# Altium PCB Thunderscope_Rev5.3.PcbDoc (part 4 of 14)
Units mil, origin at the board's own origin, x right, y up, seen from the top; angles counter-clockwise.
Board outline 3937.01 x 3838.58 mil, 6 copper layers (F.Cu, In1.Cu (GND), In2.Cu (Sign), In3.Cu (Sign), In4.Cu (GND), B.Cu), stack 60.556 mil thick; 911 components, 486 nets, 2834 pads, 2761 vias.
Unrouted connection lines stored in the file: 618.
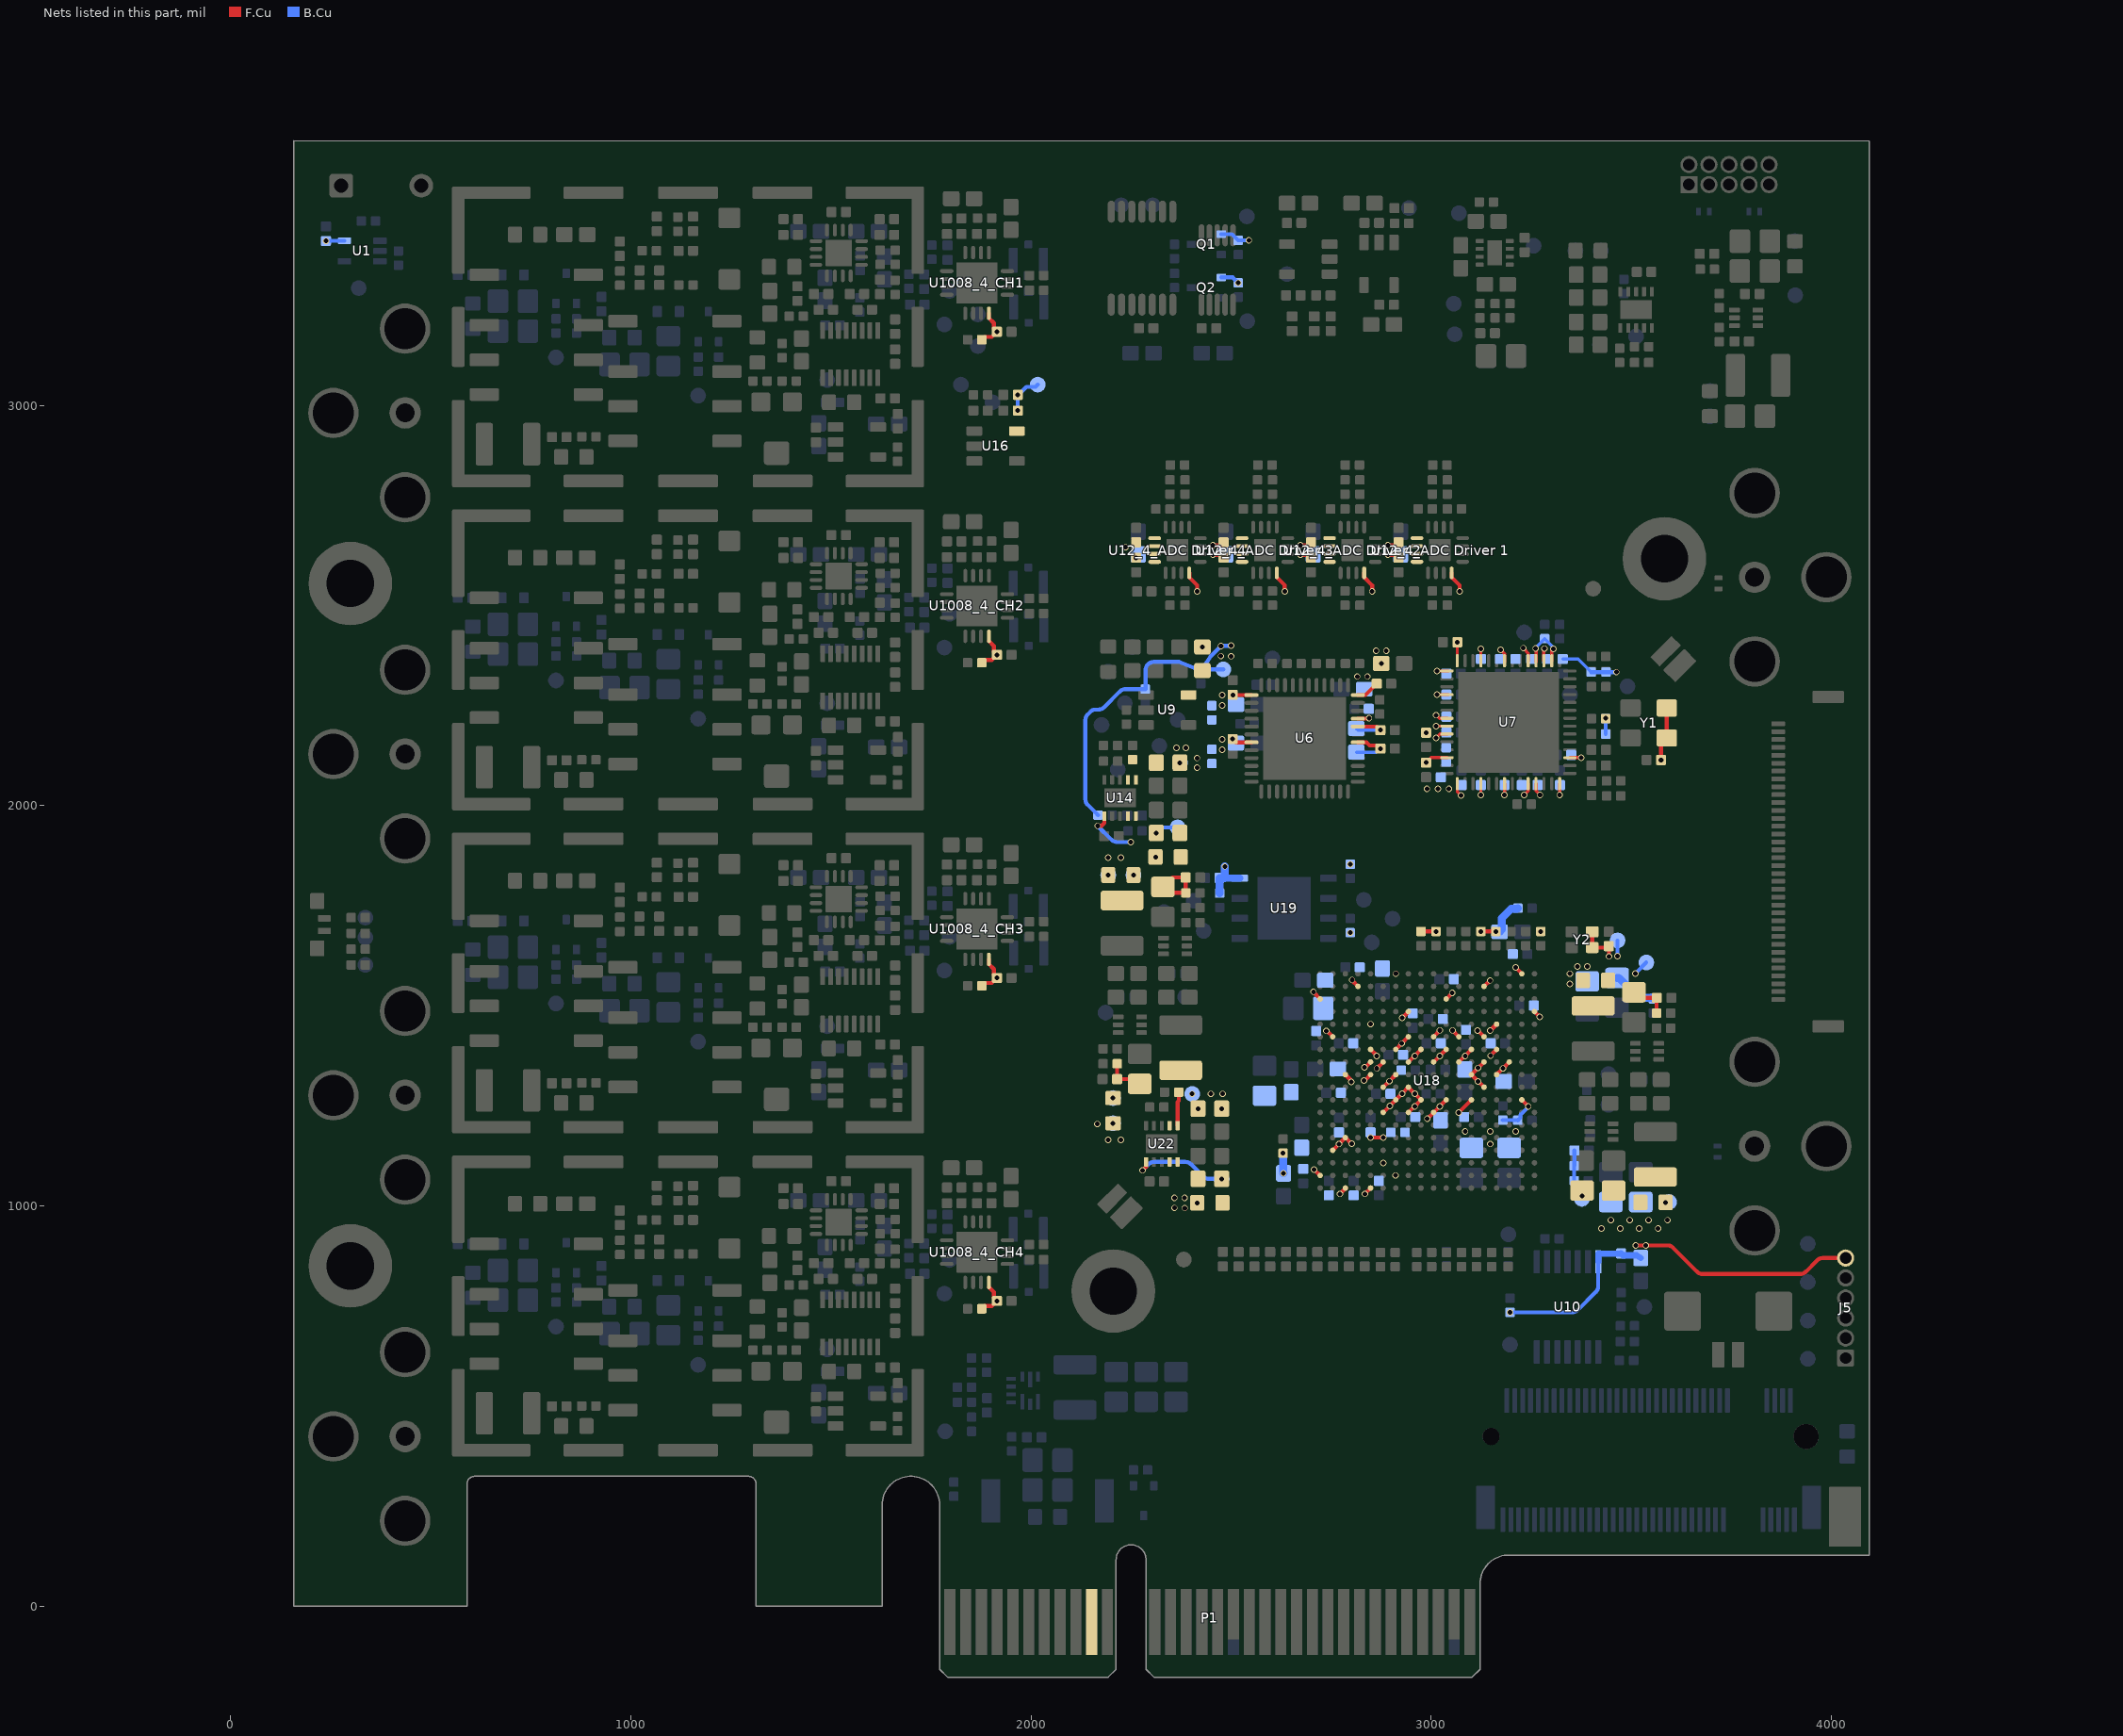
[diagram p8: the nets of this part, all layers, seen from the top]

## Footprints (in the part's own frame and the unit in brackets; to place one, negate y for a bottom-side part, rotate by r counter-clockwise, add the part's x,y. Pads: shape width x height; smd on the part's side, far side on the other; paste and mask are expansions set on the pad) (continued)
XILINX_XC7A50T-2CSG325C [mm]
  round 0.35 smd mask+0: A1(-6.8,6.8) A2(-6,6.8) A3(-5.2,6.8) A4(-4.4,6.8) A5(-3.6,6.8) A6(-2.8,6.8) A7(-2,6.8) A8(-1.2,6.8) A9(-0.4,6.8) A10(0.4,6.8) A11(1.2,6.8) A12(2,6.8) A13(2.8,6.8) A14(3.6,6.8) A15(4.4,6.8) A16(5.2,6.8) A17(6,6.8) A18(6.8,6.8) B1(-6.8,6) B2(-6,6) B3(-5.2,6) B4(-4.4,6) B5(-3.6,6) B6(-2.8,6) B7(-2,6) B8(-1.2,6) B9(-0.4,6) B10(0.4,6) B11(1.2,6) B12(2,6) B13(2.8,6) B14(3.6,6) B15(4.4,6) B16(5.2,6) B17(6,6) B18(6.8,6) C1(-6.8,5.2) C2(-6,5.2) C3(-5.2,5.2) C4(-4.4,5.2) C5(-3.6,5.2) C6(-2.8,5.2) C7(-2,5.2) C8(-1.2,5.2) C9(-0.4,5.2) C10(0.4,5.2) C11(1.2,5.2) C12(2,5.2) C13(2.8,5.2) C14(3.6,5.2) C15(4.4,5.2) C16(5.2,5.2) C17(6,5.2) C18(6.8,5.2) D1(-6.8,4.4) D2(-6,4.4) D3(-5.2,4.4) D4(-4.4,4.4) D5(-3.6,4.4) D6(-2.8,4.4) D7(-2,4.4) D8(-1.2,4.4) D9(-0.4,4.4) D10(0.4,4.4) D11(1.2,4.4) D12(2,4.4) D13(2.8,4.4) D14(3.6,4.4) D15(4.4,4.4) D16(5.2,4.4) D17(6,4.4) D18(6.8,4.4) E1(-6.8,3.6) E2(-6,3.6) E3(-5.2,3.6) E4(-4.4,3.6) E5(-3.6,3.6) E6(-2.8,3.6) E7(-2,3.6) E8(-1.2,3.6) E9(-0.4,3.6) E10(0.4,3.6) E11(1.2,3.6) E12(2,3.6) E13(2.8,3.6) E14(3.6,3.6) E15(4.4,3.6) E16(5.2,3.6) E17(6,3.6) E18(6.8,3.6) F1(-6.8,2.8) F2(-6,2.8) F3(-5.2,2.8) F4(-4.4,2.8) F5(-3.6,2.8) F6(-2.8,2.8) F7(-2,2.8) F8(-1.2,2.8) F9(-0.4,2.8) F10(0.4,2.8) F11(1.2,2.8) F12(2,2.8) F13(2.8,2.8) F14(3.6,2.8) F15(4.4,2.8) F16(5.2,2.8) F17(6,2.8) F18(6.8,2.8) G1(-6.8,2) G2(-6,2) G3(-5.2,2) G4(-4.4,2) G5(-3.6,2) G6(-2.8,2) G7(-2,2) G8(-1.2,2) G9(-0.4,2) G10(0.4,2) G11(1.2,2) G12(2,2) G13(2.8,2) G14(3.6,2) G15(4.4,2) G16(5.2,2) G17(6,2) G18(6.8,2) H1(-6.8,1.2) H2(-6,1.2) H3(-5.2,1.2) H4(-4.4,1.2) H5(-3.6,1.2) H6(-2.8,1.2) H7(-2,1.2) H8(-1.2,1.2) H9(-0.4,1.2) H10(0.4,1.2) H11(1.2,1.2) H12(2,1.2) H13(2.8,1.2) H14(3.6,1.2) H15(4.4,1.2) H16(5.2,1.2) H17(6,1.2) H18(6.8,1.2) J1(-6.8,0.4) J2(-6,0.4) J3(-5.2,0.4) J4(-4.4,0.4) J5(-3.6,0.4) J6(-2.8,0.4) J7(-2,0.4) J8(-1.2,0.4) J9(-0.4,0.4) J10(0.4,0.4) J11(1.2,0.4) J12(2,0.4) J13(2.8,0.4) J14(3.6,0.4) J15(4.4,0.4) J16(5.2,0.4) J17(6,0.4) J18(6.8,0.4) K1(-6.8,-0.4) K2(-6,-0.4) K3(-5.2,-0.4) K4(-4.4,-0.4) K5(-3.6,-0.4) K6(-2.8,-0.4) K7(-2,-0.4) K8(-1.2,-0.4) K9(-0.4,-0.4) K10(0.4,-0.4) K11(1.2,-0.4) K12(2,-0.4) K13(2.8,-0.4) K14(3.6,-0.4) K15(4.4,-0.4) K16(5.2,-0.4) K17(6,-0.4) K18(6.8,-0.4) L1(-6.8,-1.2) L2(-6,-1.2) L3(-5.2,-1.2) L4(-4.4,-1.2) L5(-3.6,-1.2) L6(-2.8,-1.2) L7(-2,-1.2) L8(-1.2,-1.2) L9(-0.4,-1.2) L10(0.4,-1.2) L11(1.2,-1.2) L12(2,-1.2) L13(2.8,-1.2) L14(3.6,-1.2) L15(4.4,-1.2) L16(5.2,-1.2) L17(6,-1.2) L18(6.8,-1.2) M1(-6.8,-2) M2(-6,-2) M3(-5.2,-2) M4(-4.4,-2) M5(-3.6,-2) M6(-2.8,-2) M7(-2,-2) M8(-1.2,-2) M9(-0.4,-2) M10(0.4,-2) M11(1.2,-2) M12(2,-2) M13(2.8,-2) M14(3.6,-2) M15(4.4,-2) M16(5.2,-2) M17(6,-2) M18(6.8,-2) N1(-6.8,-2.8) N2(-6,-2.8) N3(-5.2,-2.8) N4(-4.4,-2.8) N5(-3.6,-2.8) N6(-2.8,-2.8) N7(-2,-2.8) N8(-1.2,-2.8) N9(-0.4,-2.8) N10(0.4,-2.8) N11(1.2,-2.8) N12(2,-2.8) N13(2.8,-2.8) N14(3.6,-2.8) N15(4.4,-2.8) N16(5.2,-2.8) N17(6,-2.8) N18(6.8,-2.8) P1(-6.8,-3.6) P2(-6,-3.6) P3(-5.2,-3.6) P4(-4.4,-3.6) P5(-3.6,-3.6) P6(-2.8,-3.6) P7(-2,-3.6) P8(-1.2,-3.6) P9(-0.4,-3.6) P10(0.4,-3.6) P11(1.2,-3.6) P12(2,-3.6) P13(2.8,-3.6) P14(3.6,-3.6) P15(4.4,-3.6) P16(5.2,-3.6) P17(6,-3.6) P18(6.8,-3.6) R1(-6.8,-4.4) R2(-6,-4.4) R3(-5.2,-4.4) R4(-4.4,-4.4) R5(-3.6,-4.4) R6(-2.8,-4.4) R7(-2,-4.4) R8(-1.2,-4.4) R9(-0.4,-4.4) R10(0.4,-4.4) R11(1.2,-4.4) R12(2,-4.4) R13(2.8,-4.4) R14(3.6,-4.4) R15(4.4,-4.4) R16(5.2,-4.4) R17(6,-4.4) R18(6.8,-4.4) T1(-6.8,-5.2) T2(-6,-5.2) T3(-5.2,-5.2) T4(-4.4,-5.2) T5(-3.6,-5.2) T6(-2.8,-5.2) T7(-2,-5.2) T8(-1.2,-5.2) T9(-0.4,-5.2) T10(0.4,-5.2) T11(1.2,-5.2) T12(2,-5.2) T13(2.8,-5.2) T14(3.6,-5.2) T15(4.4,-5.2) T16(5.2,-5.2) T17(6,-5.2) T18(6.8,-5.2) U1(-6.8,-6) U2(-6,-6) U3(-5.2,-6) U4(-4.4,-6) U5(-3.6,-6) U6(-2.8,-6) U7(-2,-6) U8(-1.2,-6) U9(-0.4,-6) U10(0.4,-6) U11(1.2,-6) U12(2,-6) U13(2.8,-6) U14(3.6,-6) U15(4.4,-6) U16(5.2,-6) U17(6,-6) U18(6.8,-6) V1(-6.8,-6.8) V2(-6,-6.8) V3(-5.2,-6.8) V4(-4.4,-6.8) V5(-3.6,-6.8) V6(-2.8,-6.8) V7(-2,-6.8) V8(-1.2,-6.8) V9(-0.4,-6.8) V10(0.4,-6.8) V11(1.2,-6.8) V12(2,-6.8) V13(2.8,-6.8) V14(3.6,-6.8) V15(4.4,-6.8) V16(5.2,-6.8) V17(6,-6.8) V18(6.8,-6.8)
  silkscreen extent -8.27,-7.5 7.5,7.5, body extent -7.5,-7.5 7.5,7.5, height 1.4

## Part data
C1 C2 C3 C5 C6 C7 C8 C11 C16 C17 C18 C19 C24 C25 C48 C49 C50 C51 C52 C53 C54 C55 C56 C57 C58 C59 C60 C61 C62 C63 C68 "C70_4_ADC Driver 1" "C70_4_ADC Driver 2" "C70_4_ADC Driver 3" "C70_4_ADC Driver 4" C76 C78 C88 C89 C90 C91 C92 C102 C103 "C104_4_ADC Driver 1" "C104_4_ADC Driver 2" "C104_4_ADC Driver 3" "C104_4_ADC Driver 4" "C105_4_ADC Driver 1" "C105_4_ADC Driver 2" "C105_4_ADC Driver 3" "C105_4_ADC Driver 4" C112 C125 C126 C127 C130 C138 C139 C140 C141 C148 C149 C150 C151 C154 C155 C156 C157 C164 C165 C166 C167 C191 C1009_4_CH1 C1009_4_CH2 C1009_4_CH3 C1009_4_CH4 C1010_4_CH1 C1010_4_CH2 C1010_4_CH3 C1010_4_CH4 C1036_4_CH1 C1036_4_CH2 C1036_4_CH3 C1036_4_CH4 C1037_4_CH1 C1037_4_CH2 C1037_4_CH3 C1037_4_CH4 C1038_4_CH1 C1038_4_CH2 C1038_4_CH3 C1038_4_CH4 C1043_4_CH1 C1043_4_CH2 C1043_4_CH3 C1043_4_CH4 C1044_4_CH1 C1044_4_CH2 C1044_4_CH3 C1044_4_CH4 C1045_4_CH1 C1045_4_CH2 C1045_4_CH3 C1045_4_CH4 C1046_4_CH1 C1046_4_CH2 C1046_4_CH3 C1046_4_CH4 C1047_4_CH1 C1047_4_CH2 C1047_4_CH3 C1047_4_CH4 C1048_4_CH1 C1048_4_CH2 C1048_4_CH3 C1048_4_CH4 C1049_4_CH1 C1049_4_CH2 C1049_4_CH3 C1049_4_CH4 C1050_4_CH1 C1050_4_CH2 C1050_4_CH3 C1050_4_CH4 C1052_4_CH1 C1052_4_CH2 C1052_4_CH3 C1052_4_CH4 C1053_4_CH1 C1053_4_CH2 C1053_4_CH3 C1053_4_CH4 C1054_4_CH1 C1054_4_CH2 C1054_4_CH3 C1054_4_CH4 C1055_4_CH1 C1055_4_CH2 C1055_4_CH3 C1055_4_CH4 C1056_4_CH1 C1056_4_CH2 C1056_4_CH3 C1056_4_CH4 C1057_4_CH1 C1057_4_CH2 C1057_4_CH3 C1057_4_CH4: library part "CAP 1uF 25V X5R 0402", MANUFACTURER=Murata, MANUFACTURER PART NUMBER=GRM155R61E105KA12D, PACKAGE=0402, SUPPLIER PART NUMBER 1=81-GRM155R61E105KA2D, VOLTAGE RATING=25V, Substitutions Policy="Any Parametric Equivalent", SUPPLIER 1=Mouser
C4 C74 C174 C178 C186 C1001_4_CH1 C1001_4_CH2 C1001_4_CH3 C1001_4_CH4 C1034_4_CH1 C1034_4_CH2 C1034_4_CH3 C1034_4_CH4 C1035_4_CH1 C1035_4_CH2 C1035_4_CH3 C1035_4_CH4: library part "CAP 100pF 50V C0G 0402", MANUFACTURER=Murata, MANUFACTURER PART NUMBER=GCM1555C1H101FA16D, PACKAGE=0402, SUPPLIER PART NUMBER 1=81-GCM1555C1H101FA6D, TEMPERATURE COEFFICIENT=C0G, VOLTAGE RATING=50V, Substitutions Policy="Any Parametric Equivalent", SUPPLIER 1=Mouser
C9 C10 C14 C15 C20 C21 C23 C26 "C69_4_ADC Driver 1" "C69_4_ADC Driver 2" "C69_4_ADC Driver 3" "C69_4_ADC Driver 4" C71 C72 C73 C79 C85 C93 C94 C95 C96 C106 C107 C108 C109 C110 C111 C114 C115 C116 C117 C118 C119 C120 C121 C122 C142 C143 C146 C147 C158 C159 C162 C163 C168 C173 C175 C179 C181 C182 C183 C184 C187 C1003_4_CH1 C1003_4_CH2 C1003_4_CH3 C1003_4_CH4 C1004_4_CH1 C1004_4_CH2 C1004_4_CH3 C1004_4_CH4 C1005_4_CH1 C1005_4_CH2 C1005_4_CH3 C1005_4_CH4 C1006_4_CH1 C1006_4_CH2 C1006_4_CH3 C1006_4_CH4 C1007_4_CH1 C1007_4_CH2 C1007_4_CH3 C1007_4_CH4 C1008_4_CH1 C1008_4_CH2 C1008_4_CH3 C1008_4_CH4 C1039_4_CH1 C1039_4_CH2 C1039_4_CH3 C1039_4_CH4 C1040_4_CH1 C1040_4_CH2 C1040_4_CH3 C1040_4_CH4: library part "CAP 10uF 25V X5R 0603", MANUFACTURER=Murata, MANUFACTURER PART NUMBER=GRM188R61E106MA73D, PACKAGE=0402, SUPPLIER PART NUMBER 1=81-GRM188R61E106MA3D, VOLTAGE RATING=25V, Substitutions Policy="Any Parametric Equivalent", SUPPLIER 1=Mouser
C12 C22 C75 C80 C83 C84 C97 C98 C99 C101 C128 C176 C177 C180 C188 C1026_4_CH1 C1026_4_CH2 C1026_4_CH3 C1026_4_CH4 C1027_4_CH1 C1027_4_CH2 C1027_4_CH3 C1027_4_CH4 C1028_4_CH1 C1028_4_CH2 C1028_4_CH3 C1028_4_CH4 C1029_4_CH1 C1029_4_CH2 C1029_4_CH3 C1029_4_CH4: library part "CAP 22uF 25V X5R 0805", HOUSE PART NUMBER=C-22uF-0805-002, MANUFACTURER=Murata, MANUFACTURER PART NUMBER=GRM21BR61E226ME44L, PACKAGE=0805, SUPPLIER PART NUMBER 1=81-GRM21BR61E226ME4L, VOLTAGE RATING=25V, Substitutions Policy="Any Parametric Equivalent", SUPPLIER 1=Mouser
C13 C27 C44 C45 C46 C47 C65 C66 C67 C77 C81 C82 C123 C124 C129 C169 C170 C171 C172 C185 C189 C190 C1032_4_CH1 C1032_4_CH2 C1032_4_CH3 C1032_4_CH4 C1033_4_CH1 C1033_4_CH2 C1033_4_CH3 C1033_4_CH4 C1041_4_CH1 C1041_4_CH2 C1041_4_CH3 C1041_4_CH4 C1042_4_CH1 C1042_4_CH2 C1042_4_CH3 C1042_4_CH4: library part "CAP 100nF 16V X7R 0402", HOUSE PART NUMBER=C-100nF-0402-002, MANUFACTURER=Murata, MANUFACTURER PART NUMBER=GCM155R71C104KA55D, PACKAGE=0402, SUPPLIER PART NUMBER 1=81-GCM155R71C104KA5D, VOLTAGE RATING=16V, Substitutions Policy="Any Parametric Equivalent", SUPPLIER 1=Mouser
C28 C29 C30 C31 C32 C33 C34 C35 C36 C37 C38 C39 C40 C41 C42 C43: library part "CAP 220nF 16V X7R 0402", HOUSE PART NUMBER=C-100nF-0402-002, MANUFACTURER=Murata, MANUFACTURER PART NUMBER=GCM155R71C224KE02D, PACKAGE=0402, SUPPLIER PART NUMBER 1=81-GCM155R71C224KE2D, VOLTAGE RATING=16V, Substitutions Policy="Any Parametric Equivalent", SUPPLIER 1=Mouser
C64 R2 R3 R4 R5 R25 R26 R27 R28 R29 R30 R31 R32 R33 R34 R35 R36 R37 R38 R39 R40 R41 R52_4_CH1 R52_4_CH2 R52_4_CH3 R52_4_CH4 R97_4_CH1 R97_4_CH2 R97_4_CH3 R97_4_CH4 R1053_4_CH1 R1053_4_CH2 R1053_4_CH3 R1053_4_CH4: library part "RES 0 OHM 1/16W 0402", MANUFACTURER=Yageo, MANUFACTURER PART NUMBER=RC0402JR-070RL, PACKAGE=0402, SUPPLIER PART NUMBER 1=603-RC0402JR-070RL, Substitutions Policy="Any Parametric Equivalent", SUPPLIER 1=Mouser
C86 C87 C144 C145 C152 C153 C160 C161: library part "CAP 47uF 6.3V X5R 0805", HOUSE PART NUMBER=C-47uF-0805-002, MANUFACTURER=Samsung, MANUFACTURER PART NUMBER=CL21A476MQYNNNE, PACKAGE=0805, SUPPLIER PART NUMBER 1=187-CL32A226KPJNNNE, VOLTAGE RATING=6.3V, Substitutions Policy="Any Parametric Equivalent", SUPPLIER 1=Mouser
C100 C1058_4_CH1 C1058_4_CH2 C1058_4_CH3 C1058_4_CH4: library part "CAP 18pF 50V C0G 0402", MANUFACTURER=KEMET, MANUFACTURER PART NUMBER=CBR04C180F5GAC, PACKAGE=0402, SUPPLIER PART NUMBER 1=80-CBR04C180F5G, TEMPERATURE COEFFICIENT=C0G, VOLTAGE RATING=50V, Substitutions Policy="No Substitutions", SUPPLIER 1=Mouser
C1002_4_CH1 C1002_4_CH2 C1002_4_CH3 C1002_4_CH4: library part "CAP 68pF 50V C0G 0402", MANUFACTURER=Murata, MANUFACTURER PART NUMBER=GCM1555C1H680FA16J, PACKAGE=0402, SUPPLIER PART NUMBER 1=81-GCM1555C1H680FA6J, TEMPERATURE COEFFICIENT=C0G, VOLTAGE RATING=50V, Substitutions Policy="Any Parametric Equivalent", SUPPLIER 1=Mouser
C1011_4_CH1 C1011_4_CH2 C1011_4_CH3 C1011_4_CH4 C1021_4_CH1 C1021_4_CH2 C1021_4_CH3 C1021_4_CH4 C1023_4_CH1 C1023_4_CH2 C1023_4_CH3 C1023_4_CH4: library part "CAP 3pF 200V C0G 0402", MANUFACTURER=KEMET, MANUFACTURER PART NUMBER=CBR04C309B2GAC, PACKAGE=0402, SUPPLIER PART NUMBER 1=80-CBR04C309B2GAC, TEMPERATURE COEFFICIENT=C0G, VOLTAGE RATING=200V, Substitutions Policy="No Substitutions", SUPPLIER 1=Mouser
C1012_4_CH1 C1012_4_CH2 C1012_4_CH3 C1012_4_CH4: library part "CAP 0.3pF 100V Thin Film 0402", MANUFACTURER="KYOCERA AVX", MANUFACTURER PART NUMBER=04021J0R3ZBSTR, PACKAGE=0402, SUPPLIER PART NUMBER 1=581-04021J0R3ZBSTR, VOLTAGE RATING=100V, Substitutions Policy="No Substitutions", SUPPLIER 1=Mouser
C1022_4_CH1 C1022_4_CH2 C1022_4_CH3 C1022_4_CH4: library part "CAP DNP 0603", PACKAGE=0603
C1024_4_CH1 C1024_4_CH2 C1024_4_CH3 C1024_4_CH4: library part "CAP 1pF 50V C0G 0402", MANUFACTURER=KEMET, MANUFACTURER PART NUMBER=CBR04C109A5GAC, PACKAGE=0402, SUPPLIER PART NUMBER 1=80-CBR04C109A5GAC, VOLTAGE RATING=50V, Substitutions Policy="No Substitutions", SUPPLIER 1=Mouser
C1025_4_CH1 C1025_4_CH2 C1025_4_CH3 C1025_4_CH4: library part "CAP 8pF 50V C0G 0402", MANUFACTURER=KEMET, MANUFACTURER PART NUMBER=CBR04C809B5GAC, PACKAGE=0402, SUPPLIER PART NUMBER 1=80-CBR04C809B5GAC, TEMPERATURE COEFFICIENT=C0G, VOLTAGE RATING=50V, Substitutions Policy="No Substitutions", SUPPLIER 1=Mouser
C1030_4_CH1 C1030_4_CH2 C1030_4_CH3 C1030_4_CH4: library part "CAP 1nF 100V C0G 0603", MANUFACTURER=Murata, MANUFACTURER PART NUMBER=GCM1885C2A102FA16D, PACKAGE=0603, SUPPLIER PART NUMBER 1=81-GCM1885C2A102FA6D, TEMPERATURE COEFFICIENT=C0G, VOLTAGE RATING=100V, Substitutions Policy="ECO Required for Substitution", SUPPLIER 1=Mouser
C1031_4_CH1 C1031_4_CH2 C1031_4_CH3 C1031_4_CH4: library part "CAP 10nF 50V C0G 0603", MANUFACTURER=Murata, MANUFACTURER PART NUMBER=GRM1885C1H103JA01J, PACKAGE=0603, SUPPLIER PART NUMBER 1=81-GRM1885C1H103JA1J, VOLTAGE RATING=50V, Substitutions Policy="ECO Required for Substitution", SUPPLIER 1=Mouser
C1059_4_CH1 C1059_4_CH2 C1059_4_CH3 C1059_4_CH4: library part "CAP TRIMMER 2-6PF 100V", MANUFACTURER="EW Electronics", MANUFACTURER PART NUMBER=SGC3S060, PACKAGE="2-SMD (4.5x3.2mm)", SUPPLIER PART NUMBER 1=2447-SGC3S060CT-ND, Substitutions Policy="ECO Required for Substitution", SUPPLIER 1=Digikey
D1: library part "LED RGB 1204 APFA3010LSEKJ3ZGKQBC", "A-SP1103R6GHB1W-A01-2C", MANUFACTURER=Kingbright, MANUFACTURER PART NUMBER=APFA3010LSEKJ3ZGKQBC, PACKAGE=4-SMD, SUPPLIER PART NUMBER 1=604-APFA3010LSEKJ3ZG, Substitutions Policy="ECO Required for Substitution", SUPPLIER 1=Mouser
D2 D3 D4 D5: library part "TVS TPD1E1B04", MANUFACTURER="Texas Instruments", MANUFACTURER PART NUMBER=TPD1E1B04DPYR, PACKAGE="2-X1SON (1x0.6mm)", Substitutions Policy="No Substitutions", SUPPLIER 1="Texas Instruments", SUPPLIER PART NUMBER 1=TPD1E1B04DPYR
D1000_4_CH1 D1000_4_CH2 D1000_4_CH3 D1000_4_CH4 D1001_4_CH1 D1001_4_CH2 D1001_4_CH3 D1001_4_CH4: library part "DIODE 1N4148", MANUFACTURER=Diodes, PACKAGE=SOD-523, SUPPLIER PART NUMBER 1=621-1N4148WT, MANUFACTURER PART NUMBER=1N4148WT-7, Substitutions Policy="ECO Required for Substitution", SUPPLIER 1=Mouser
EMI1 EMI2: library part "EMI FINGER 2286211-3", MANUFACTURER="TE Connectivity", PACKAGE="Surface Mount", SUPPLIER PART NUMBER 1=571-2286211-3, MANUFACTURER PART NUMBER=2286211-3, Substitutions Policy="No Substitutions", SUPPLIER 1=Mouser
FB1 FB2 FB3 FB11 FB12 FB13 FB1000_4_CH1 FB1000_4_CH2 FB1000_4_CH3 FB1000_4_CH4 FB1001_4_CH1 FB1001_4_CH2 FB1001_4_CH3 FB1001_4_CH4 R91: library part "FERRITE BEAD 120 OHM 0402", HOUSE PART NUMBER=BLM15PX121SN1D, MANUFACTURER=Murata, PACKAGE=0402, SUPPLIER PART NUMBER 1=81-BLM15PX121SN1D, MANUFACTURER PART NUMBER=BLM15PX121SN1D, Substitutions Policy="No Substitutions", SUPPLIER 1=Mouser
FID1 FID2: library part "FID 1mm", HOUSE PART NUMBER=Fiducial-1
J1 J2 J1002_4_CH1 J1002_4_CH2 J1002_4_CH3 J1002_4_CH4: library part "BNC JACK R/A", MANUFACTURER=Molex, MANUFACTURER PART NUMBER=73100-0105, PACKAGE="Through Hole", SUPPLIER PART NUMBER 1=538-73100-0105, Substitutions Policy="No Substitutions", SUPPLIER 1=Mouser
J3: library part "CONN 1.27mm 2x5 Pin TH RA", MANUFACTURER="CNC Tech", MANUFACTURER PART NUMBER=3220-10-0200-00, PACKAGE="Through Hole", SUPPLIER PART NUMBER 1=1175-1628-ND, Substitutions Policy="ECO Required for Substitution", SUPPLIER 1=Digi-Key
J3_4_CH1 J3_4_CH2 J3_4_CH3 J3_4_CH4 J4_4_CH1 J4_4_CH2 J4_4_CH3 J4_4_CH4: library part "UFL Jack SMD", MANUFACTURER="TE Connectivity", MANUFACTURER PART NUMBER=2334884-1, PACKAGE="Surface Mount", SUPPLIER PART NUMBER 1=571-2334884-1, SUPPLIER 1=Mouser
J4: library part "CONN 5.08mm 2 Pin TH RA", MANUFACTURER=Samtec, PACKAGE="Through Hole", SUPPLIER PART NUMBER 1=200-TSW10116GQRA, MANUFACTURER PART NUMBER=TSW-101-16-G-Q-RA, Substitutions Policy="ECO Required for Substitution", SUPPLIER 1=Mouser
J5: library part "CONN 2.54mm 6 Pin TH RA", MANUFACTURER="Wurth Electronics", MANUFACTURER PART NUMBER=61300611021, PACKAGE="Through Hole", SUPPLIER PART NUMBER 1=710-61300611021, Substitutions Policy="ECO Required for Substitution", SUPPLIER 1=Mouser
J8: library part "CONN M.2 Key M FEMALE", MANUFACTURER="TE Connectivity", MANUFACTURER PART NUMBER=1-2199230-5, PACKAGE="Surface Mount", SUPPLIER PART NUMBER 1=571-1-2199230-5, Substitutions Policy="No Substitutions", SUPPLIER 1=Mouser
J9: library part "CONN FFC BOTTOM 36POS 0.5MM RA", MANUFACTURER="Amphenol ICC", PACKAGE="Surface Mount", SUPPLIER PART NUMBER 1=649-F3001B7H111036E1, MANUFACTURER PART NUMBER=F300-1B7H1-11036-E100, Substitutions Policy="No Substitutions", SUPPLIER 1=Mouser
J10: library part "CONN 1.27mm 2PIN", MANUFACTURER="KYOCERA AVX", MANUFACTURER PART NUMBER=009155002852006, PACKAGE="Surface Mount", SUPPLIER PART NUMBER 1=581-009155002852006, Substitutions Policy="No Substitutions", SUPPLIER 1=Mouser
K1000_4_CH1 K1000_4_CH2 K1000_4_CH3 K1000_4_CH4 K1001_4_CH1 K1001_4_CH2 K1001_4_CH3 K1001_4_CH4: library part "RELAY DPDT-NO UD2-4.5NUN-L", MANUFACTURER=KEMET, PACKAGE="Surface Mount", SUPPLIER PART NUMBER 1=80-UD2-4.5NUN-L, MANUFACTURER PART NUMBER=UD2-4.5NUN-L, Substitutions Policy="No Substitutions", SUPPLIER 1=Mouser
L1 L2 L3 L4 L5: library part "IND 1uH 5.5A 32 MOHM 1210", HOUSE PART NUMBER=SRP3212-1R0M, MANUFACTURER=Bourns, PACKAGE=1210, SUPPLIER PART NUMBER 1=652-SRP3212-1R0M, MANUFACTURER PART NUMBER=SRP3212-1R0M, Substitutions Policy="ECO Required for Substitution", SUPPLIER 1=Mouser
L6: library part "IND 1uH 5.5A 32 MOHM 1210", "DFE322520FD-2R2M=P2", HOUSE PART NUMBER=SRP3212-1R0M, MANUFACTURER=Bourns, PACKAGE=1210, SUPPLIER PART NUMBER 1=652-SRP3212-1R0M, MANUFACTURER PART NUMBER=SRP3212-1R0M, Substitutions Policy="ECO Required for Substitution", SUPPLIER 1=Mouser
Q1 Q2 Q3 Q1002_4_CH1 Q1002_4_CH2 Q1002_4_CH3 Q1002_4_CH4 Q1003_4_CH1 Q1003_4_CH2 Q1003_4_CH3 Q1003_4_CH4: library part "NMOS DMN62D0UW", HOUSE PART NUMBER=DMN62D0UW-7, MANUFACTURER=Diodes, PACKAGE=SOT-323, SUPPLIER PART NUMBER 1=621-DMN62D0UW-7, MANUFACTURER PART NUMBER=DMN62D0UW-7, Substitutions Policy="ECO Required for Substitution", SUPPLIER 1=Mouser, VDSS=60V
R1 R8 R15 R16 R17 R45 R58 R59 R61 R62 R66 R67 R68 R72 R75 R76 R77 R78 R79 R80 R81 R82 R86 R87 R92 R94 R101 R108 R111 R117 R118 R121 R124 R128 R129 R130 R1029_4_CH1 R1029_4_CH2 R1029_4_CH3 R1029_4_CH4 R1030_4_CH1 R1030_4_CH2 R1030_4_CH3 R1030_4_CH4 R1031_4_CH1 R1031_4_CH2 R1031_4_CH3 R1031_4_CH4 R1032_4_CH1 R1032_4_CH2 R1032_4_CH3 R1032_4_CH4 R1033_4_CH1 R1033_4_CH2 R1033_4_CH3 R1033_4_CH4 R1044_4_CH1 R1044_4_CH2 R1044_4_CH3 R1044_4_CH4 R1052_4_CH1 R1052_4_CH2 R1052_4_CH3 R1052_4_CH4: library part "RES 10K OHM 1% 1/16W 0402", MANUFACTURER=Yageo, MANUFACTURER PART NUMBER=RC0402FR-0710KL, PACKAGE=0402, SUPPLIER PART NUMBER 1=603-RC0402FR-0710KL, TOLERANCE=1%, Substitutions Policy="Any Parametric Equivalent", SUPPLIER 1=Mouser
R6 R64 R127 R1043_4_CH1 R1043_4_CH2 R1043_4_CH3 R1043_4_CH4: library part "RES 2K OHM 1% 1/16W 0402", MANUFACTURER=Yageo, MANUFACTURER PART NUMBER=RC0402FR-072KL, PACKAGE=0402, SUPPLIER PART NUMBER 1=603-RC0402FR-072KL, TOLERANCE=1%, Substitutions Policy="Any Parametric Equivalent", SUPPLIER 1=Mouser
R7 R22 R60 R107 R112 R115: library part "RES 100 OHM 1% 1/10W 0402", MANUFACTURER=Yageo, MANUFACTURER PART NUMBER=RC0402FR-07100RL, PACKAGE=0402, SUPPLIER PART NUMBER 1=603-RC0402FR-07100RL, TOLERANCE=1%, Substitutions Policy="Any Parametric Equivalent", SUPPLIER 1=Mouser
R9 R10 R11 R12 R46 R47 R69 R70 R73 R99 R102 R104 R113 R114 R119: library part "RES 4.7K OHM 1% 1/16W 0402", MANUFACTURER=Yageo, MANUFACTURER PART NUMBER=RC0402FR-074K7L, PACKAGE=0402, SUPPLIER PART NUMBER 1=603-RC0402FR-074K7L, TOLERANCE=1%, Substitutions Policy="Any Parametric Equivalent", SUPPLIER 1=Mouser
R13: library part "RES ARRAY 2x 10K OHM 0.05% 0606", MANUFACTURER="Vishay Beyschlag", MANUFACTURER PART NUMBER=ACASN1002S1002P1ATF1002X, PACKAGE=0606, SUPPLIER PART NUMBER 1=594-ACASN1002S1002AT, TOLERANCE=1%, Substitutions Policy="No Substitutions", SUPPLIER 1=Mouser
R14 R42 R54 R57 R71 R89 R97 R98 R116 R120 R123 R126: library part "RES 0.01 OHM 1% 1/4W 0603", HOUSE PART NUMBER=R-0.01-0603-1%-001, MANUFACTURER=Susumu, MANUFACTURER PART NUMBER=RL0816T-R010-F, PACKAGE=0603, SUPPLIER PART NUMBER 1=754-RL0816T-R010-F, TOLERANCE=1%, Substitutions Policy="Any Parametric Equivalent", SUPPLIER 1=Mouser
R18 R19 R20 R21 R1048_4_CH1 R1048_4_CH2 R1048_4_CH3 R1048_4_CH4: library part "RES DNP 0402", PACKAGE=0402, TOLERANCE=1%
R23 R24 R43 R63 R1037_4_CH1 R1037_4_CH2 R1037_4_CH3 R1037_4_CH4: library part "RES 49.9 OHM 1% 1/10W 0402", MANUFACTURER=Yageo, MANUFACTURER PART NUMBER=RC0402FR-0749R9L, PACKAGE=0402, SUPPLIER PART NUMBER 1=603-RC0402FR-0749R9L, TOLERANCE=1%, Substitutions Policy="Any Parametric Equivalent", SUPPLIER 1=Mouser
R44 R48 R49 R50 R51 R52 R53 R65 R74 R85 R95 R125 R1001_4_CH1 R1001_4_CH2 R1001_4_CH3 R1001_4_CH4 R1045_4_CH1 R1045_4_CH2 R1045_4_CH3 R1045_4_CH4 R1046_4_CH1 R1046_4_CH2 R1046_4_CH3 R1046_4_CH4: library part "RES 1K OHM 1% 1/10W 0402", HOUSE PART NUMBER=R-1K-0402-1%-001, MANUFACTURER=Yageo, MANUFACTURER PART NUMBER=RC0402FR-071KL, PACKAGE=0402, SUPPLIER PART NUMBER 1=603-RC0402FR-071KL, TOLERANCE=1%, Substitutions Policy="Any Parametric Equivalent", SUPPLIER 1=Mouser
R55 R96 R1041_4_CH1 R1041_4_CH2 R1041_4_CH3 R1041_4_CH4 R1042_4_CH1 R1042_4_CH2 R1042_4_CH3 R1042_4_CH4 R1047_4_CH1 R1047_4_CH2 R1047_4_CH3 R1047_4_CH4: library part "RES 90.9K OHM 1% 1/16W 0402", MANUFACTURER=Yageo, MANUFACTURER PART NUMBER=RC0402FR-0790K9L, PACKAGE=0402, SUPPLIER PART NUMBER 1=603-RC0402FR-0790K9L, TOLERANCE=1%, Substitutions Policy="Any Parametric Equivalent", SUPPLIER 1=Mouser
R56 R100 R103 R105 R122 R1026_4_CH1 R1026_4_CH2 R1026_4_CH3 R1026_4_CH4: library part "RES 20K OHM 1% 1/16W 0402", MANUFACTURER=Yageo, MANUFACTURER PART NUMBER=RC0402FR-0720KL, PACKAGE=0402, SUPPLIER PART NUMBER 1=603-RC0402FR-0720KL, TOLERANCE=1%, Substitutions Policy="Any Parametric Equivalent", SUPPLIER 1=Mouser
R88 R110 R1036_4_CH1 R1036_4_CH2 R1036_4_CH3 R1036_4_CH4: library part "RES 35.7K OHM 1% 1/16W 0402", MANUFACTURER=Yageo, MANUFACTURER PART NUMBER=RC0402FR-0735K7L, PACKAGE=0402, SUPPLIER PART NUMBER 1=603-RC0402FR-0735K7L, TOLERANCE=1%, Substitutions Policy="Any Parametric Equivalent", SUPPLIER 1=Mouser
R90 R106: library part "RES 0.1 OHM 1% 1/6W 0402", MANUFACTURER=Panasonic, MANUFACTURER PART NUMBER=ERJ-2BSFR10X, PACKAGE=0402, SUPPLIER PART NUMBER 1=667-ERJ-2BSFR10X, TOLERANCE=1%, Substitutions Policy="Any Parametric Equivalent", SUPPLIER 1=Mouser
R93 R109: library part "RES 280K OHM 1% 1/16W 0402", MANUFACTURER=Yageo, MANUFACTURER PART NUMBER=RC0402FR-07280KL, PACKAGE=0402, SUPPLIER PART NUMBER 1=603-RC0402FR-07280KL, TOLERANCE=1%, Substitutions Policy="Any Parametric Equivalent", SUPPLIER 1=Mouser
"R131_4_ADC Driver 1" "R131_4_ADC Driver 2" "R131_4_ADC Driver 3" "R131_4_ADC Driver 4": library part "RES 120 OHM 1% 1/16W 0402", MANUFACTURER=Yageo, MANUFACTURER PART NUMBER=RC0402FR-07120RL, PACKAGE=0402, SUPPLIER PART NUMBER 1=603-RC0402FR-07120RL, TOLERANCE=1%, Substitutions Policy="Any Parametric Equivalent", SUPPLIER 1=Mouser
"R132_4_ADC Driver 1" "R132_4_ADC Driver 2" "R132_4_ADC Driver 3" "R132_4_ADC Driver 4" "R133_4_ADC Driver 1" "R133_4_ADC Driver 2" "R133_4_ADC Driver 3" "R133_4_ADC Driver 4" "R134_4_ADC Driver 1" "R134_4_ADC Driver 2" "R134_4_ADC Driver 3" "R134_4_ADC Driver 4" "R135_4_ADC Driver 1" "R135_4_ADC Driver 2" "R135_4_ADC Driver 3" "R135_4_ADC Driver 4": library part "RES 300 OHM 0.1% 1/16W 0402", MANUFACTURER=Panasonic, MANUFACTURER PART NUMBER=ERA-2AEB301X, PACKAGE=0402, SUPPLIER PART NUMBER 1=667-ERA-2AEB301X, TOLERANCE=0.1%, Substitutions Policy="ECO Required for Substitution", SUPPLIER 1=Mouser
"R136_4_ADC Driver 1" "R136_4_ADC Driver 2" "R136_4_ADC Driver 3" "R136_4_ADC Driver 4" "R137_4_ADC Driver 1" "R137_4_ADC Driver 2" "R137_4_ADC Driver 3" "R137_4_ADC Driver 4": library part "RES 4.99 OHM 1% 1/16W 0402", MANUFACTURER=Yageo, MANUFACTURER PART NUMBER=RC0402FR-074R99L, PACKAGE=0402, SUPPLIER PART NUMBER 1=603-RC0402FR-074R99L, TOLERANCE=1%, Substitutions Policy="Any Parametric Equivalent", SUPPLIER 1=Mouser
R1002_4_CH1 R1002_4_CH2 R1002_4_CH3 R1002_4_CH4 R1024_4_CH1 R1024_4_CH2 R1024_4_CH3 R1024_4_CH4: library part "RES 976k OHM 1% 1/10W 0402", MANUFACTURER="KOA Speer", MANUFACTURER PART NUMBER=RK73H1ETTP9763F, PACKAGE=0402, SUPPLIER PART NUMBER 1=660-RK73H1ETTP9763F, TOLERANCE=1%, Substitutions Policy="ECO Required for Substitution", SUPPLIER 1=Mouser
R1003_4_CH1 R1003_4_CH2 R1003_4_CH3 R1003_4_CH4 R1038_4_CH1 R1038_4_CH2 R1038_4_CH3 R1038_4_CH4: library part "RES 10M OHM 1% 1/10W 0603", MANUFACTURER="KOA Speer", MANUFACTURER PART NUMBER=RK73H1JTTD1005F, PACKAGE=0603, SUPPLIER PART NUMBER 1=660-RK73H1JTTD1005F, TOLERANCE=1%, Substitutions Policy="No Substitutions", SUPPLIER 1=Mouser
R1021_4_CH1 R1021_4_CH2 R1021_4_CH3 R1021_4_CH4: library part "RES 15 OHM 1% 1/3W 0603", MANUFACTURER="KOA Speer", MANUFACTURER PART NUMBER=SG73P1JTTD15R0F, PACKAGE=0603, SUPPLIER PART NUMBER 1=660-SG73P1JTTD15R0F, TOLERANCE=1%, Substitutions Policy="No Substitutions", SUPPLIER 1=Mouser
R1022_4_CH1 R1022_4_CH2 R1022_4_CH3 R1022_4_CH4 R1035_4_CH1 R1035_4_CH2 R1035_4_CH3 R1035_4_CH4: library part "RES 30 OHM 1% 1/3W 0603", MANUFACTURER="KOA Speer", MANUFACTURER PART NUMBER=SG73P1JTTD30R0F, PACKAGE=0603, SUPPLIER PART NUMBER 1=660-SG73P1JTTD30R0F, TOLERANCE=1%, Substitutions Policy="No Substitutions", SUPPLIER 1=Mouser
R1025_4_CH1 R1025_4_CH2 R1025_4_CH3 R1025_4_CH4: library part "RES 49.9 OHM 1% 1W 0508", MANUFACTURER="KOA Speer", MANUFACTURER PART NUMBER=WK73R2ATTD49R9F, PACKAGE=0508, POWER RATING=1W, SUPPLIER PART NUMBER 1=660-WK73R2ATTD49R9F, TOLERANCE=1%, Substitutions Policy="No Substitutions", SUPPLIER 1=Mouser
R1027_4_CH1 R1027_4_CH2 R1027_4_CH3 R1027_4_CH4 R1028_4_CH1 R1028_4_CH2 R1028_4_CH3 R1028_4_CH4: library part "RES 22 OHM 1% 1/3W 0603", MANUFACTURER="KOA Speer", MANUFACTURER PART NUMBER=SG73P1JTTD22R0F, PACKAGE=0603, SUPPLIER PART NUMBER 1=660-SG73P1JTTD22R0F, TOLERANCE=1%, Substitutions Policy="No Substitutions", SUPPLIER 1=Mouser
R1039_4_CH1 R1039_4_CH2 R1039_4_CH3 R1039_4_CH4: library part "RES 909K OHM 1% 1/16W 0402", MANUFACTURER=Yageo, MANUFACTURER PART NUMBER=RC0402FR-07909KL, PACKAGE=0402, SUPPLIER PART NUMBER 1=603-RC0402FR-07909KL, TOLERANCE=1%, Substitutions Policy="Any Parametric Equivalent", SUPPLIER 1=Mouser
R1049_4_CH1 R1049_4_CH2 R1049_4_CH3 R1049_4_CH4: library part "TRIMMER 2K OHM 0.1W J LEAD TOP", MANUFACTURER=Bourns, MANUFACTURER PART NUMBER=TC33X-2-202E, PACKAGE="2-SMD (3.8x3.6mm)", SUPPLIER PART NUMBER 1=652-TC33X-2-202E, TOLERANCE=1%, Substitutions Policy="ECO Required for Substitution", SUPPLIER 1=Mouser
REF** REF**: library part Paw
REF**: library part Heart
REF**: library part OSHW-Logo_5.7x6mm_SilkScreen, "Open Source Hardware Logo"
REF**: library part UKCA-Logo_3.3x3.3mm_SilkScreen, "UKCA marking"
REF**: library part CE-Logo_3.3x4.5mm_SilkScreen, "CE marking"
SHLD1001_4_CH1 SHLD1001_4_CH2 SHLD1001_4_CH3 SHLD1001_4_CH4: library part "SHIELD 2118728-2", MANUFACTURER="TE Connectivity", PACKAGE="Surface Mount", SUPPLIER PART NUMBER 1=571-2118728-2, MANUFACTURER PART NUMBER=2118728-2, Substitutions Policy="No Substitutions", SUPPLIER 1=Mouser
SO1 SO2 SO3 SO4: library part STANDOFF_M2_9774025243R, MANUFACTURER="Wurth Elektronik", MANUFACTURER PART NUMBER=9774025243R, PACKAGE="Surface Mount", SUPPLIER PART NUMBER 1=710-9774025243R, Substitutions Policy="No Substitutions", SUPPLIER 1=Mouser
TP1 TP4 TP5 TP6 TP7 TP8 TP9 TP10 TP11 TP12 TP13 TP16 TP17 TP18 TP21 TP22 TP23 TP24 TP25 TP26 TP27 TP28 TP29 TP30 TP31 TP32 TP33 TP34 TP35 TP37 TP38 TP39 TP40 TP42 TP43 TP44 TP46 TP47 TP48 TP49 TP50 TP52 TP53 TP54 TP55 TP56 TP57 TP58 TP59 TP60 TP61 TP63 TP64 TP65 TP66 TP67 TP68 TP69 TP70 TP71 TP72 TP75 TP76 TP77 TP78 TP79 TP80 TP81 TP86 TP1014_4_CH1 TP1014_4_CH2 TP1014_4_CH3 TP1014_4_CH4 TP1015_4_CH1 TP1015_4_CH2 TP1015_4_CH3 TP1015_4_CH4 TP1016_4_CH1 TP1016_4_CH2 TP1016_4_CH3 TP1016_4_CH4 TP1017_4_CH1 TP1017_4_CH2 TP1017_4_CH3 TP1017_4_CH4 TP1018_4_CH1 TP1018_4_CH2 TP1018_4_CH3 TP1018_4_CH4: library part "TP PCB 1mm"
TP2: library part "TP KEYSTONE 5019", MANUFACTURER="Keystone Electronics", SUPPLIER PART NUMBER 1=534-5019, MANUFACTURER PART NUMBER=5019, SUPPLIER 1=Mouser
TP14 TP15: library part "TP KEYSTONE 5015", MANUFACTURER="Keystone Electronics", SUPPLIER PART NUMBER 1=534-5015, MANUFACTURER PART NUMBER=5015, SUPPLIER 1=Mouser
U1: library part "IC BUFFER SN74LVC1G17", MANUFACTURER="Texas Instruments", MANUFACTURER PART NUMBER=SN74LVC1G17DCKR, PACKAGE=SC-70-5, Substitutions Policy="ECO Required for Substitution", SUPPLIER 1="Texas Instruments", SUPPLIER PART NUMBER 1=SN74LVC1G17DCKR
U2: library part "IC DIGIPOT QUAD MCP4452-104E", MANUFACTURER=Microchip, PACKAGE=14-TSSOP, SUPPLIER PART NUMBER 1=579-MCP4452-104E/ST, MANUFACTURER PART NUMBER=MCP4452-104E, Substitutions Policy="ECO Required for Substitution", SUPPLIER 1=Mouser
U3: library part "IC DAC QUAD MCP4728", MANUFACTURER=Microchip, MANUFACTURER PART NUMBER=MCP4728T-E/UN, PACKAGE=10-MSOP, SUPPLIER PART NUMBER 1=579-MCP4728T-E/UN, Substitutions Policy="ECO Required for Substitution", SUPPLIER 1=Mouser
U4: library part "IC VREF REF2025", MANUFACTURER="Texas Instruments", MANUFACTURER PART NUMBER=REF2025AIDDCR, PACKAGE=SOT-23-5, Substitutions Policy="No Substitutions", SUPPLIER 1="Texas Instruments", SUPPLIER PART NUMBER 1=REF2025AIDDCR
U5 U1011_4_CH1 U1011_4_CH2 U1011_4_CH3 U1011_4_CH4: library part "IC OPAMP OPA140", MANUFACTURER="Texas Instruments", PACKAGE=SOT-23-5, MANUFACTURER PART NUMBER=OPA140AIDBVR, Substitutions Policy="No Substitutions", SUPPLIER 1="Texas Instruments", SUPPLIER PART NUMBER 1=OPA140AIDBVR
U6: library part "IC ADC HMCAD1520", MANUFACTURER="Analog Devices", PACKAGE="48-QFN (7x7mm)", SUPPLIER PART NUMBER 1=584-HMCAD1520, MANUFACTURER PART NUMBER=HMCAD1520, Substitutions Policy="No Substitutions", SUPPLIER 1=Mouser
U7: library part "IC CLK GEN ZL30260LDG1", MANUFACTURER=Microchip, PACKAGE="56-VFQFN (8x8mm)", SUPPLIER PART NUMBER 1=494-ZL30260LDG1, MANUFACTURER PART NUMBER=ZL30260LDG1, Substitutions Policy="No Substitutions", SUPPLIER 1=Mouser
U8 U20 U21 U23: library part "IC BUCK TPS62A02", HOUSE PART NUMBER=TPS62A02DRLR, MANUFACTURER="Texas Instruments", PACKAGE=SOT-563, MANUFACTURER PART NUMBER=TPS62A02DRLR, Substitutions Policy="No Substitutions", SUPPLIER 1="Texas Instruments", SUPPLIER PART NUMBER 1=TPS62A02DRLR
U9 U16: library part "IC LDO NCP161ASN330T1G", MANUFACTURER=onsemi, PACKAGE=SOT-23-5, SUPPLIER PART NUMBER 1=863-NCP161ASN330T1G, MANUFACTURER PART NUMBER=NCP161ASN330T1G, Substitutions Policy="No Substitutions", SUPPLIER 1=Mouser
U10: library part "IC LVDS XCVR FIN1019MTCX", MANUFACTURER=onsemi, PACKAGE=14-TSSOP, SUPPLIER PART NUMBER 1=512-FIN1019MTCX, MANUFACTURER PART NUMBER=FIN1019MTCX, Substitutions Policy="No Substitutions", SUPPLIER 1=Mouser
U11: library part "IC BUCK MODULE TPS62913", MANUFACTURER="Texas Instruments", MANUFACTURER PART NUMBER=TPSM82913RDUR, PACKAGE="28-B0QFN (4.5x5.5mm)", Substitutions Policy="No Substitutions", SUPPLIER 1="Texas Instruments", SUPPLIER PART NUMBER 1=TPSM82913RDUR
"U12_4_ADC Driver 1" "U12_4_ADC Driver 2" "U12_4_ADC Driver 3" "U12_4_ADC Driver 4": library part "IC ADC DRIVER ADA4930-1YCPZ", MANUFACTURER="Analog Devices", MANUFACTURER PART NUMBER=ADA4930-1YCPZ-R7, PACKAGE="16-QFN (3x3mm)", SUPPLIER PART NUMBER 1=584-ADA4930-1YCPZ-R7, Substitutions Policy="No Substitutions", SUPPLIER 1=Mouser
U13: library part "IC CPUMP LM27761", MANUFACTURER="Texas Instruments", MANUFACTURER PART NUMBER=LM27761DSGR, PACKAGE="8-WFDFN (2x2mm)", Substitutions Policy="No Substitutions", SUPPLIER 1="Texas Instruments", SUPPLIER PART NUMBER 1=LM27761DSGR
U14 U15 U22: library part "IC LDO TPS7A9101", MANUFACTURER="Texas Instruments", MANUFACTURER PART NUMBER=TPS7A9101DSKR, PACKAGE="10-DFN (2.5x2.5mm)", Substitutions Policy="No Substitutions", SUPPLIER 1="Texas Instruments", SUPPLIER PART NUMBER 1=TPS7A9101DSKR
U17: library part "IC BOOST TPS61023", MANUFACTURER="Texas Instruments", MANUFACTURER PART NUMBER=TPS61023DRLT, PACKAGE=SOT-563, Substitutions Policy="No Substitutions", SUPPLIER 1="Texas Instruments", SUPPLIER PART NUMBER 1=TPS61023DRLT
U18: HOUSE PART NUMBER=XC7A50T-2CSG325C, MANUFACTURER=Xilinx, PACKAGE="324-BGA (15x15mm)", SUPPLIER PART NUMBER 1=122-2193-ND, MANUFACTURER PART NUMBER=XC7A50T-2CSG325C, Substitutions Policy="No Substitutions", SUPPLIER 1=Digi-Key
U19: library part "IC FLASH MX25L6433FZNI-08G", HOUSE PART NUMBER=MX25L6433FZNI-08G-TR, MANUFACTURER=Macronix, PACKAGE="8-WSON (6x5mm)", SUPPLIER PART NUMBER 1=95-25L6433FZNI08TR, MANUFACTURER PART NUMBER=MX25L6433FZNI-08G-TR, Substitutions Policy="ECO Required for Substitution", SUPPLIER 1=Mouser
U1001_4_CH1 U1001_4_CH2 U1001_4_CH3 U1001_4_CH4: library part "IC SWITCH 3X SPDT TMUX4053", MANUFACTURER="Texas Instruments", MANUFACTURER PART NUMBER=TMUX4053DYYR, PACKAGE=16-SOT-23-THIN, Substitutions Policy="No Substitutions", SUPPLIER 1="Texas Instruments", SUPPLIER PART NUMBER 1=TMUX4053DYYR
U1008_4_CH1 U1008_4_CH2 U1008_4_CH3 U1008_4_CH4: library part "IC PGA LMH6518", MANUFACTURER="Texas Instruments", MANUFACTURER PART NUMBER=LMH6518SQX/NOPB, PACKAGE="16-WQFN (4x4mm)", Substitutions Policy="No Substitutions", SUPPLIER 1="Texas Instruments", SUPPLIER PART NUMBER 1=LMH6518SQX/NOPB
U1009_4_CH1 U1009_4_CH2 U1009_4_CH3 U1009_4_CH4: library part "IC BUFFER AMP BUF802", MANUFACTURER="Texas Instruments", MANUFACTURER PART NUMBER=BUF802IRGTR, PACKAGE="16-VQFN (3x3mm)", Substitutions Policy="No Substitutions", SUPPLIER 1="Texas Instruments", SUPPLIER PART NUMBER 1=BUF802IRGTR
Y1: library part "OSC 10MHz ECS-TXO-3225MV", MANUFACTURER="ECS International", MANUFACTURER PART NUMBER=ECS-TXO-3225MV-100-TR, PACKAGE="4-SMD (3.2x2.5mm)", SUPPLIER PART NUMBER 1=520-TXO-3225MV-100-T, Substitutions Policy="ECO Required for Substitution", SUPPLIER 1=Mouser
Y2: library part "OSC 25MHz ECS-TXO-2016", HOUSE PART NUMBER=ECS-TXO-2016-33-250-TR, MANUFACTURER="ECS International", PACKAGE="4-SMD (2.0x1.6mm)", SUPPLIER PART NUMBER 1=520-TXO-2016-33-250T, MANUFACTURER PART NUMBER=ECS-TXO-2016-33-250-TR, Substitutions Policy="ECO Required for Substitution", SUPPLIER 1=Mouser
P1: CLASSNAME="Edge Connector", DATASHEET VERSION="rev2.0, Apr-2007", MATING CONNECTOR=Molex-87715-9106, PACKAGE REFERENCE=PCIeX4-GF-2D-1000-1K-O64, PUBLISHER=Altium

## Via types
v1: diameter 16, hole 11.81, F.Cu to B.Cu, tented both sides, 2761 vias

## Nets (pads, with @x,y where several pads share a name; then routed paths per layer and width w, separated by ;. In a path a pad name is that pad's centre, name@x,y a point inside that pad or via, vN(x,y) a via of type N, cw(c..) or ccw(c..) an arc to the next point about the centre after c; other vN are vias at no path point)
3.3Vaux: P1.B10
+1V0: C86.2 C87.2 C153.2 C154.1 C155.1 C156.1 C157.1 C158.2 C159.2 C160.2 FB13.2 R116.2 TP66.1 U18.F7 U18.F9 U18.F11 U18.G8 U18.G10 U18.H7 U18.H9 U18.H11 U18.J8 U18.J12 U18.K7 U18.K11 U18.L8 U18.L12 U18.M7 U18.M11 U18.N8 U18.N10 U18.N12 U18.P9 U18.P11 | length 577.3
  F.Cu w10: v1@2864.36,1344 U18.F11@2880.11,1359.74 ; U18.F7@2879.84,1233.57 U18.F7@2879.98,1233.62 ; U18.F7@2879.98,1233.7 U18.F7@2879.98,1233.62 ; U18.F9@2879.98,1296.62 v1@2895.23,1311.87 ; v1@2895.23,1248.88 U18.F7@2879.98,1233.62 ; v1(2895.73,1311.87) 2895.73,1312.36 2911.47,1328.11 U18.G10@2911.34,1328.06 ; v1(2896.51,1249.86) 2896.91,1249.86 2897.3,1250.26 2897.3,1250.95 v1@2926.73,1280.38 ; v1(2927.22,1280.38) 2927.22,1280.87 2942.97,1296.62 2942.83,1296.56 v1@2958.58,1280.81 ; U18.H7@2942.97,1233.62 v1@2958.23,1248.88 ; U18.H11@2942.97,1359.61 v1@2958.23,1374.86 ; v1(2958.72,1248.88) 2958.72,1249.37 2974.47,1265.12 2959.07,1280.51 v1(2959.07,1280.81) ; v1(2958.72,1374.86) 2958.72,1375.36 2974.47,1391.1 U18.J12@2974.33,1391.05 ; v1@2990.21,1217.88 3005.96,1233.62 v1@3021.22,1248.88 ; U18.K11@3005.96,1359.61 v1@3021.22,1374.86 ; v1(3021.71,1248.88) 3021.71,1249.37 U18.L8@3037.46,1265.12 ; v1(3021.71,1374.86) 3021.71,1375.36 3037.46,1391.1 U18.L12@3037.32,1391.05 ; U18.M7@3068.95,1233.62 v1(3068.9,1233.76) U18.N8@3100.39,1265.26 U18.N8@3100.45,1265.12 ; U18.M11@3068.95,1359.61 v1@3084.21,1374.86 ; v1(3084.7,1374.86) 3084.7,1375.36 3100.45,1391.1 U18.N12@3100.31,1391.05 ; U18.N10@3100.31,1328.06 U18.N10@3100.45,1328.11 ; U18.N10@3100.51,1327.98 U18.N10@3100.45,1328.11 ; v1@3115.71,1343.37 U18.N10@3100.45,1328.11 ; v1(3116.59,1344.75) 3117.08,1344.75 3131.95,1359.61 U18.P11@3131.81,1359.55 ; v1@3116.69,1311.87 U18.P9@3131.95,1296.62 ; v1@3117.38,1311.28 3116.3,1312.36 3116.2,1312.36 U18.N10@3100.45,1328.11
  other v1: 3425.2,943.81 3472.44,943.81 3519.68,943.81 3566.93,943.81 3448.82,964.57 3496.06,964.57 3543.31,964.57 3590.55,964.57 3585.63,1008.86 3147.69,1154.98 3084.7,1186.48 3147.69,1186.48 3210.69,1186.48 2990.21,1218.37 3116.99,1311.28 2864.23,1343.5
+1V0_MGT: C171.2 C172.2 C173.2 FB13.1 U18.B4 U18.C5 U18.E5 U18.F5 | length 98
  F.Cu w10: U18.B4@2753.99,1139.14 2769.74,1154.88 v1(2769.74,1154.98) 2769.84,1154.98 2785.49,1170.63 2785.98,1170.63 2800.84,1155.77 v1@2800.84,1155.53 ; U18.E5@2848.48,1170.63 v1(2848.62,1170.77) v1(2879.92,1170.77) 2879.98,1170.71 U18.F5@2879.98,1170.63
  other v1: 2801.24,1155.38
+1V0_R: C174.2 C176.2 C177.2 L2.2 R69.2 R116.1 R118.2 TP65.1 | length 76
  B.Cu w10: R69.2@3357.28,1062.99 R118.2@3357.28,1100.39 3357.87,1100.98 C174.2@3357.87,1138.78
  other v1: 3377,1025
+1V2_MGT: C168.2 C169.2 C170.2 C183.2 C184.2 C189.2 C190.2 R115.1 R125.1 TP50.1 U18.A2 U18.C1 U18.E1 U18.F3 U18.G2 U22.1 U22.2 | length 200.5
  F.Cu w10: U22.1@2366.14,1200.79 2366.14,1259.84 2369.09,1262.8 R125.1@2369.09,1284.45 ; v1(2707.47,1091.25) U18.A2@2722.44,1076.28 U18.A2@2722.5,1076.14 ; v1(2771.71,1030.18) U18.C1@2786.68,1045.15 ; v1(2834.63,1030.13) 2834.63,1030.56 2849.22,1045.15 U18.E1@2849.67,1045.15 ; v1(2879.92,1107.78) 2879.92,1107.7 U18.F3@2879.98,1107.64 ; v1(2910.74,1076.28) U18.G2@2911.42,1076.28 2911.47,1076.22 U18.G2@2911.47,1076.14
  B.Cu w20: v1(2629.92,1131.89) 2629.92,1082.68 v1(2630.91,1081.69)
  other v1: 2417.32,1243.11 2476.38,1243.11 2402.75,1280.12 2449,1280 2478.81,1280.12
+1V8: C161.2 C162.2 C163.2 C164.1 C165.1 C166.1 FB12.1 R120.2 R123.1 TP64.1 U18.E11 U18.G12 U18.H13 U18.K13 U18.M13 U18.P13 | length 134.2
  F.Cu w10: v1(2832.98,1346.32) 2835.11,1346.32 2848.35,1359.55 U18.E11@2848.48,1359.61 ; U18.G12@2911.47,1391.1 2911.61,1391.16 v1(2926.58,1406.13) 2926.58,1406.21 2942.97,1422.6 U18.H13@2943.03,1422.47 ; U18.K13@3005.96,1422.6 3005.96,1423.09 v1(3021.71,1438.84) ; v1(3053.21,1438.84) 3068.95,1423.09 U18.M13@3068.95,1422.6 ; v1(3115.8,1438.45) 3116.59,1438.45 3131.95,1423.09 U18.P13@3131.95,1422.6
  other v1: 2358.27,995.08 2384,995 2415.35,1007.87 2358.27,1020.67 2383.86,1020.67 2192.91,1165.35 2224.41,1165.35 2165.35,1204.72 2204.72,1206.69
+1V8_ACQ: C92.1 C117.2 C118.2 FB1.2 FB2.1 FB3.2 R99.2 TP33.1 U14.1 U14.2
  other v1: 2989.17,2042.32 3016.73,2042.32 3044.29,2042.32 2414.76,2095.47 2372.05,2107.28 2414.76,2119.09 2363.38,2144.29 2387.01,2144.29
+1V8_R: C178.2 C180.2 L3.2 R120.1 R122.2 TP63.1 | length 110
  F.Cu w10: R122.2@2215.55,1355.31 2214.96,1354.72 C178.2@2214.96,1316.93 C180.2@2259.84,1316.93 ; C180.2@2265.75,1316.93 2274.61,1308.07 C180.2@2277.56,1305.12
  B.Cu w10: v1(2204.72,1269.69) TP63.1@2211.61,1262.8
+1V8_R_LDO: C181.2 C182.2 R123.2 TP49.1 U22.6 U22.9 U22.10 | length 247
  F.Cu w10: v1(2278.35,1088.98) 2278.74,1088.98 2287.4,1097.64 U22.6@2287.4,1110.24
  B.Cu w10: v1(2278.35,1088.98) 2293.78,1104.41 cw(c2307.89,1090.24) 2307.89,1110.24 2385.43,1110.24 cw(c2385.43,1090.24) 2399.54,1104.41 2430.21,1073.74 ccw(c2444.32,1087.91) 2444.32,1067.91 v1(2476.38,1067.91)
+1V8A: C14.2 C15.2 C16.1 C17.1 C23.2 C24.1 FB2.2 U6.1 U6.32 U6.36 | length 245.3
  F.Cu w10: v1(2477.36,2276.57) v1@2477.95,2277.17 ; C17.1@2503.94,2277.17 v1(2504.53,2276.57) U6.1@2550.91,2276.57 ; U6.32@2816.66,2197.83 2864.06,2197.83 v1(2872.92,2188.98) C24.1@2872.92,2187.99 ; U6.36@2816.66,2276.57 2835.24,2276.57 C16.1@2863.78,2305.12 ; C14.2@2863.78,2344.09 v1(2875,2355.32)
  B.Cu w8: C23.2@2812.99,2192.91 2816.93,2188.98 v1(2872.92,2188.98)
  other v1: 2477.78,2250.61 2862.2,2386.81 2887.8,2386.81
+1V8APLL: C55.1 C56.1 C57.1 C58.1 C59.1 C60.1 C61.1 C62.1 C63.1 C68.1 FB3.1 U7.4 U7.10 U7.14 U7.31 U7.33 U7.39 U7.49 U7.50 U7.51 Y1.1 Y1.4 | length 416.2
  F.Cu w8: v1(3011.81,2169.29) 3021.65,2179.13 U7.51@3039.37,2179.13 ; v1(3011.81,2198.82) U7.50@3039.37,2198.82 ; v1(3011.81,2226.28) 3012.71,2226.28 3020.49,2218.5 U7.49@3039.37,2218.5 ; v1(3124.02,2026.57) U7.4@3124.02,2055.12 ; U7.39@3124.02,2358.86 v1(3124.02,2391.73) ; v1(3230.31,2393.7) 3230.31,2391.73 3231.3,2390.75 3232.28,2390.75 3242.13,2380.91 U7.33@3242.13,2362.21 ; v1(3232.28,2026.57) 3242.13,2036.42 U7.10@3242.13,2055.12 ; U7.31@3281.5,2362.21 3281.5,2391.2 v1(3282.81,2392.51) ; v1(3320.87,2026.57) U7.14@3320.87,2055.12
  F.Cu w10: v1(3574.21,2114.17) 3574.21,2154.92 Y1.4@3588.58,2169.29 Y1.1@3588.58,2244.09
  other v1: 2987.2,2182.48
+1V8D: C18.1 C19.1 C20.2 C21.2 FB1.1 U6.7 U6.30 | length 176.8
  F.Cu w10: v1(2503.94,2166.73) 2512.2,2158.46 U6.7@2550.91,2158.46 ; U6.30@2816.66,2158.46 2816.73,2158.39 2838.17,2158.39 2846.24,2150.31 2865.32,2150.31 v1(2872.92,2142.72)
  B.Cu w8: C20.2@2812.99,2133.86 2861.9,2133.86 2870.76,2142.72 v1(2872.92,2142.72)
  other v1: 2477.78,2140.18 2477.36,2166.14
+2V5: C145.2 C146.2 C147.2 C148.1 C149.1 C150.1 C151.1 R97.1 R126.2 TP68.1 U18.A16 U18.B13 U18.C10 U18.D17 U18.E14 U18.G18 U18.H15 | length 118.1
  F.Cu w10: v1(2705.57,1535.3) 2705.57,1534.1 U18.A16@2722.44,1517.22 U18.A16@2722.5,1517.09 ; v1@2737.87,1437.64 2739.03,1437.64 U18.B13@2753.94,1422.74 ; U18.C10@2785.49,1328.11 2800.74,1312.86 2800.74,1311.38 2800.45,1311.09 v1(2800.45,1309.9) ; v1(2801.96,1564.83) 2801.96,1563.69 U18.D17@2816.93,1548.72 2816.99,1548.59 U18.D17@2816.85,1548.53 ; v1(2911.42,1580.22) 2911.42,1580.14 U18.G18@2911.47,1580.08 ; v1@2926.24,1470.34 2927.91,1470.34 2943.03,1485.46 U18.H15@2942.97,1485.59
  other v1: 2737.85,1437.66 2848.43,1454.23 2927.22,1470.34 2192.91,1826.77 2192.91,1870.08 2224.41,1870.08 2311.02,1872.05
+2V5_R: C186.2 C188.2 L4.2 R126.1 R129.2 TP67.1 | length 168.2
  F.Cu w10: C188.2@2329.72,1797.24 2344.49,1782.48 R129.2@2386.81,1782.48 2386.42,1782.87 C186.2@2386.42,1820.87 2353.35,1820.87 C188.2@2329.72,1797.24
  other v1: 2255.91,1826.77
+2V5_R_ACQ: C115.2 C116.2 R97.2 TP32.1 U14.6 U14.9 U14.10 | length 195.1
  F.Cu w10: v1(2166.34,1949.8) 2176.18,1949.8 2183.07,1956.69 U14.6@2183.07,1974.41
  B.Cu w10: v1(2166.34,1949.8) 2200.87,1915.27 ccw(c2214.98,1929.45) 2214.98,1909.45 v1(2249.02,1909.45) ; v1(2312.99,1932.09) cw(c2332,1925.87) 2332,1945.87 TP32.1@2366.14,1945.87
+3V3: C78.1 C79.2 C129.2 C130.1 C138.1 C139.1 C140.1 C141.1 C142.2 C143.2 C144.2 C152.2 C191.1 J5.6 R57.2 R58.1 R59.1 R61.1 R66.1 R67.2 R68.1 R75.1 R77.1 R79.1 R82.1 R112.2 R113.2 R114.2 TP70.1 U10.14 U18.E10 U18.E12 U18.L16 U18.P17 U18.R10 U18.R12 U18.R14 U18.T11 U18.U8 U18.U18 U18.V15 U19.8 Y2.1 Y2.4 | length 1884.9
  F.Cu w10: v1(2831.95,1313.25) 2831.75,1313.05 2831.75,1311.87 2832.34,1311.28 2832.73,1311.28 2835.1,1313.64 2835.1,1314.81 2848.35,1328.06 U18.E10@2848.48,1328.11 ; U18.E12@2848.48,1391.1 2848.54,1390.97 2864.23,1375.28 2864.23,1375.06 v1@2864.62,1374.67 ; R112.2@2974.41,1686.02 v1(3011.81,1686.02) ; U18.L16@3037.46,1517.09 3037.59,1517.14 v1(3052.56,1532.12) ; v1(3124.02,1686.02) v1(3161.42,1686.02) ; U18.P17@3131.95,1548.59 3132.08,1548.64 v1(3147.05,1563.61) ; v1(3146.91,1438.05) 3146.91,1438.45 3147.3,1438.84 3148.19,1438.84 U18.R14@3163.44,1454.1 ; v1@3148.38,1376.54 3147.3,1375.46 3147.3,1375.31 3147.82,1374.79 3147.82,1375.58 3148.09,1375.85 3148.19,1375.85 3163.44,1391.1 U18.R12@3163.39,1391.24 ; U18.R10@3163.39,1328.25 3163.44,1328.11 3163.44,1328.6 3178.01,1343.17 v1@3178.01,1343.57 ; v1@3179.68,1344.35 U18.T11@3194.94,1359.61 ; v1(3210.98,1596.35) 3210.98,1595.98 3226.43,1580.53 U18.U18@3226.43,1580.08 ; U18.U8@3226.49,1264.98 3226.55,1264.85 3240.35,1251.05 3240.35,1250.91 v1(3242.41,1248.91) v1(3242.41,1248.91) ; U18.V15@3257.87,1485.73 v1@3270.73,1472.88 ; Y2.1@3402.33,1685.04 Y2.4@3402.33,1645.67 3440.13,1645.67 C130.1@3443.67,1649.21 3443.67,1645.67 3443.88,1645.46 3443.88,1623.84 v1(3444.09,1623.63) ; v1(3510.83,901.57) 3590.14,901.57 cw(c3590.14,881.57) 3604.25,895.75 3664.17,835.83 ccw(c3678.28,850) 3678.28,830 3921.72,830 ccw(c3921.72,850) 3935.83,835.83 3964.25,864.25 cw(c3978.36,850.08) 3978.36,870.08 J5.6@4035.43,870.08
  B.Cu w10: 2484.25,1818.7 2492.45,1818.7 ; R114.2@3178.8,1214.82 3179.19,1214.43 3215.8,1214.43 R113.2@3216.2,1214.04 3223.01,1220.85 3223.01,1227.89 3242.41,1247.28 v1(3242.41,1248.91) ; v1(3196.85,734.25) 3203.66,734.25 3351.95,734.25 ccw(c3351.95,754.25) 3366.06,740.08 3411.5,785.51 ccw(c3397.32,799.62) 3417.32,799.62 U10.14@3417.32,860.73 ; v1(3465.55,1624.02) TP70.1@3465.55,1663.39
  B.Cu w15.75: U10.14@3417.32,860.73 3417.32,880.61 3469.68,880.61 C78.1@3474.41,881.3 3479.13,876.57 3512.79,876.57 C79.2@3523.62,870.08
  B.Cu w17.72: C129.2@2473.73,1818.7 2474.61,1818.7 2475.45,1818.7 2492.45,1818.7 2509.45,1818.7 U19.8@2521.26,1818.7
  B.Cu w20: R68.1@2471.46,1781.5 C129.2@2471.46,1819.69 ; 2484.25,1818.7 v1(2484.25,1848.39) ; C142.2@3170.77,1685.04 3176.01,1690.28 3176.01,1718.86 3199.43,1742.28 3214.72,1742.28 R59.1@3216.54,1744.09 ; C152.2@3464.57,1569.88 3468.5,1569.88 3518.86,1519.53 3553.31,1519.53 R58.1@3555.12,1517.72
  other v1: 3536.42,901.57 3179.58,1343.57 2864,1374.89 3148.09,1375.46 3270.73,1472.31 3346.46,1554.58 3346.46,1580.17 3365.2,1598.49 3389.76,1598.49 2797.64,1682.68 3273.62,1686.02 2797.64,1853.94
+3V3_ACQ: "C69_4_ADC Driver 1.2" "C69_4_ADC Driver 2.2" "C69_4_ADC Driver 3.2" "C69_4_ADC Driver 4.2" "C70_4_ADC Driver 1.1" "C70_4_ADC Driver 2.1" "C70_4_ADC Driver 3.1" "C70_4_ADC Driver 4.1" "C105_4_ADC Driver 1.1" "C105_4_ADC Driver 2.1" "C105_4_ADC Driver 3.1" "C105_4_ADC Driver 4.1" "U12_4_ADC Driver 1.5" "U12_4_ADC Driver 1.6" "U12_4_ADC Driver 1.7" "U12_4_ADC Driver 1.8" "U12_4_ADC Driver 1.12" "U12_4_ADC Driver 2.5" "U12_4_ADC Driver 2.6" "U12_4_ADC Driver 2.7" "U12_4_ADC Driver 2.8" "U12_4_ADC Driver 2.12" "U12_4_ADC Driver 3.5" "U12_4_ADC Driver 3.6" "U12_4_ADC Driver 3.7" "U12_4_ADC Driver 3.8" "U12_4_ADC Driver 3.12" "U12_4_ADC Driver 4.5" "U12_4_ADC Driver 4.6" "U12_4_ADC Driver 4.7" "U12_4_ADC Driver 4.8" "U12_4_ADC Driver 4.12" C25.1 C26.2 C48.1 C49.1 C50.1 C51.1 C52.1 C53.1 C54.1 C88.1 C89.1 C90.1 C91.1 C109.2 C110.2 R15.1 R16.1 R45.1 R46.2 R47.2 R50.1 R51.1 R53.1 R101.1 TP27.1 U6.33 U7.1 U7.7 U7.11 U7.17 U7.30 U7.32 U7.36 U7.42 U7.43 U7.46 U7.54 U9.5 | length 1840.6
  F.Cu w8: C91.1@2990.16,2110.63 2999.61,2120.08 U7.54@3039.37,2120.08 ; v1(3014.17,2277.56) U7.46@3042.72,2277.56 ; v1(3014.17,2336.61) U7.43@3042.72,2336.61 ; U7.1@3064.96,2055.12 3064.96,2035.43 v1(3074.8,2025.59) ; U7.42@3065.02,2374.94 3065.02,2408.13 v1(3065.35,2408.46) ; v1(3173.23,2389.76) 3183.07,2379.92 U7.36@3183.07,2358.86 ; v1(3183.07,2026.57) U7.7@3183.07,2055.12 ; v1(3260.83,2392.72) 3261.81,2391.73 U7.32@3261.81,2358.86 ; U7.11@3261.81,2055.12 3261.81,2036.42 v1(3271.65,2026.57) ; U7.30@3301.18,2362.21 3301.18,2388.2 v1(3305.12,2392.13) ; U7.17@3346.46,2120.08 v1(3375,2120.08)
  F.Cu w10: 2395.53,2581.69 2395.53,2570.61 2415.35,2550.79 v1(2415.35,2535.43) ; v1(2454.59,2626.97) 2473.69,2626.97 2481.17,2619.49 ; v1(2454.59,2650.59) 2473.69,2650.59 2481.17,2658.07 ; 2614.04,2581.69 2614.04,2570.61 2633.86,2550.79 v1(2633.86,2535.43) ; v1(2673.1,2626.97) 2692.19,2626.97 2699.67,2619.49 ; v1(2673.1,2650.59) 2692.19,2650.59 2699.67,2658.07 ; U6.33@2816.66,2217.52 2843.5,2217.52 v1(2844.49,2218.5) ; 2832.55,2581.69 2832.55,2570.61 2852.37,2550.79 v1(2852.37,2535.43) ; v1(2891.61,2626.97) 2910.7,2626.97 2918.18,2619.49 ; v1(2891.61,2650.59) 2910.7,2650.59 2918.18,2658.07 ; 3051.05,2581.69 3051.05,2570.61 3070.87,2550.79 v1(3070.87,2535.43) ; R51.1@3436.02,2217.52 3436.02,2217.92 v1(3436.41,2218.31)
  B.Cu w8: v1(3260.83,2392.72) 3260.83,2394.69 R45.1@3283.46,2417.32 3305.12,2395.67 v1(3305.12,2392.13) ; C89.1@3328.74,2366.54 3366.73,2366.54 R46.2@3399.61,2333.66
  B.Cu w10: R101.1@2167.32,1976.38 2160.51,1983.19 2141.65,2002.05 cw(c2155.83,2016.16) 2135.83,2016.16 2135.83,2214.16 cw(c2155.83,2214.16) 2141.65,2228.27 2147.72,2234.33 cw(c2161.83,2220.16) 2161.83,2240.16 2168.63,2240.16 ccw(c2168.63,2260.16) 2182.74,2245.98 2222.27,2285.51 cw(c2236.38,2271.34) 2236.38,2291.34 R15.1@2285.43,2291.34 ; R15.1@2286.13,2292.03 2286.13,2338.67 cw(c2306.13,2338.67) 2291.95,2352.78 2292.78,2353.61 cw(c2306.89,2339.43) 2306.89,2359.43 2366.4,2359.43 cw(c2366.4,2339.43) 2374.03,2357.92 2409.43,2343.24 ccw(c2417.09,2361.72) 2417.09,2341.72 2417.4,2341.72 R16.1@2424.21,2340.55 ; TP27.1@2480.56,2340.47 ccw(c2479.3,2320.51) 2479.38,2340.51 2431.02,2340.51 R16.1@2424.21,2340.55 ; v1(2500,2400) cw(c2496.07,2419.61) 2496.13,2399.61 2477.98,2399.61 ccw(c2478.03,2379.61) 2474.74,2399.34 v1(2474.62,2399.22) 2474.62,2399.32 v1(2474.62,2399.22) 2473.97,2398.64 ccw(c2487.53,2383.94) 2473.45,2398.14 2449.92,2374.62 ccw(c2464.1,2360.51) 2447.21,2371.22 2435.11,2352.13 cw(c2418.22,2362.84) 2432.39,2348.73 R16.1@2424.21,2340.55 ; R46.2@3399.61,2333.66 R47.2@3437.01,2333.66 v1(3462.6,2333.66) ; R53.1@3436.02,2179.13 3436.02,2217.92 v1(3436.41,2218.31)
  other v1: 2987.2,2107.68 2814.96,2322.83 2840.55,2322.83 2500.09,2373.46 2474.6,2373.84 2428.15,2396.65 2262.66,2619.49 2236.22,2645.67
+3V3_PGA: C1.1 C76.1 C126.1 C1043_4_CH1.1 C1043_4_CH2.1 C1043_4_CH3.1 C1043_4_CH4.1 Q1.2 Q2.2 R9.2 R10.2 R1033_4_CH1.1 R1033_4_CH2.1 R1033_4_CH3.1 R1033_4_CH4.1 TP39.1 U1.5 U16.5 U1008_4_CH1.12 U1008_4_CH2.12 U1008_4_CH3.12 U1008_4_CH4.12 | length 670.5